# Altium PCB AVP32F08_EVM_Rev1.1.PcbDoc (part 1 of 2)
Units mm, origin at the board's own origin, x right, y up, seen from the top; angles counter-clockwise.
Board outline 120.23 x 75.25 mm, 4 copper layers (Top Layer, GND, S1, Bottom Layer), stack 2.642 mm thick; 139 components, 118 nets, 534 pads, 235 vias.
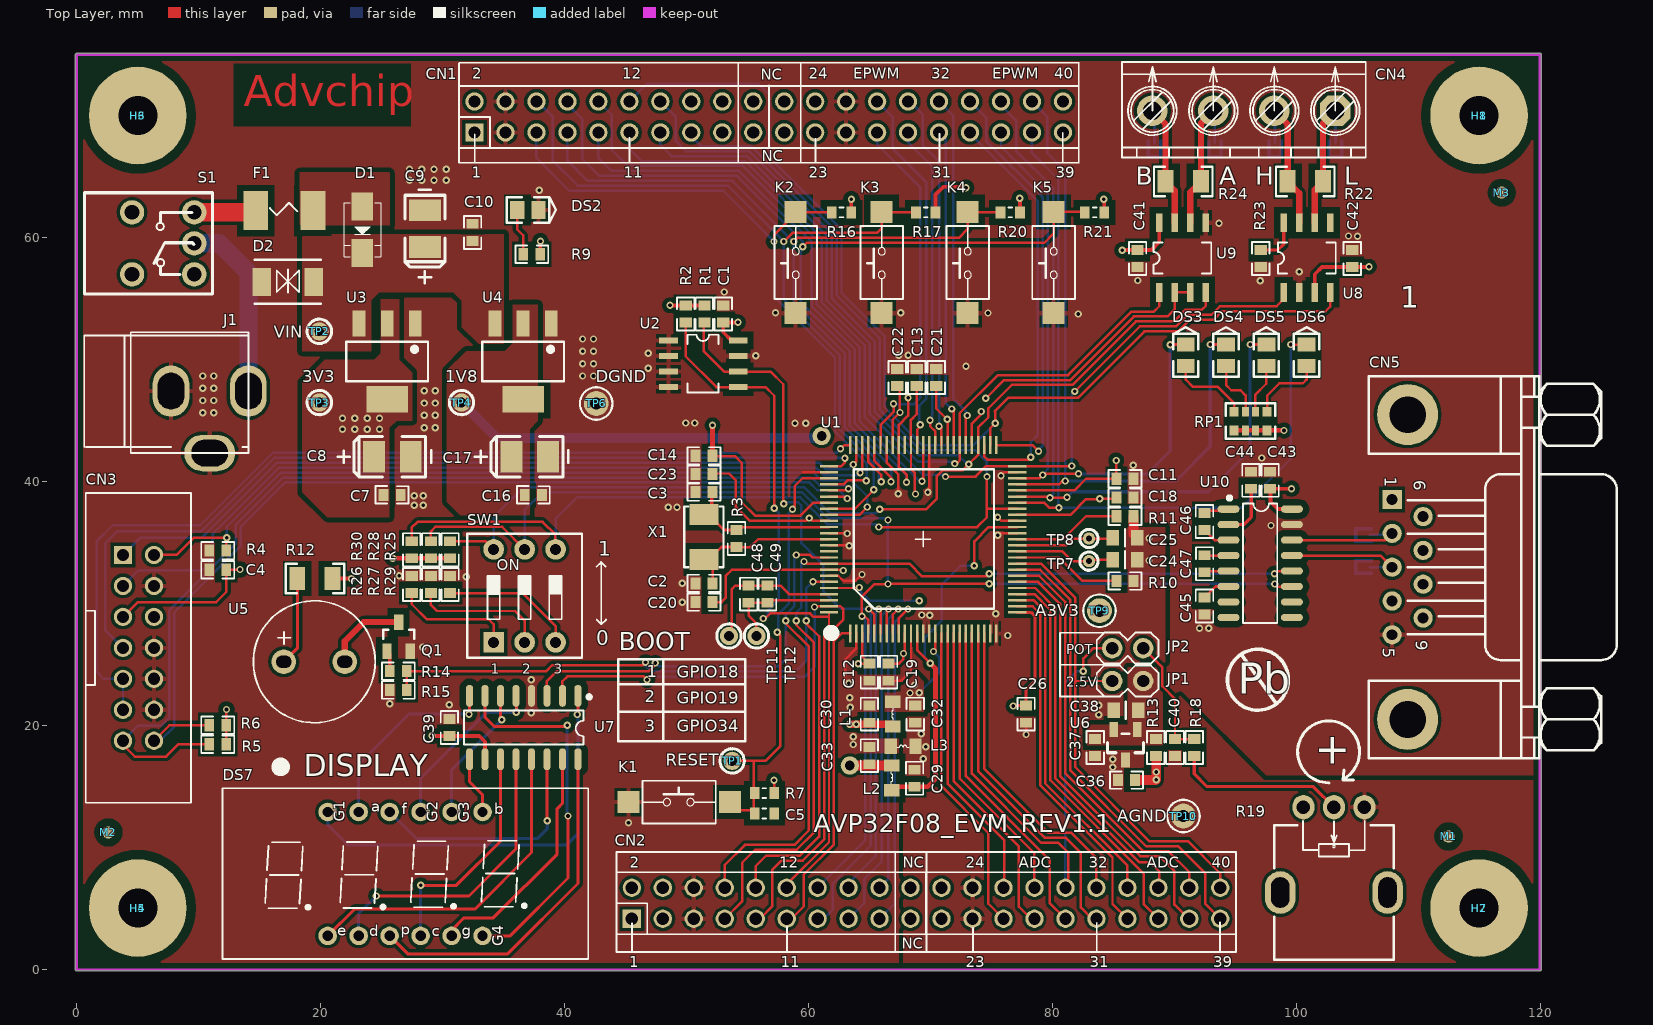
[diagram p0: Top Layer view]
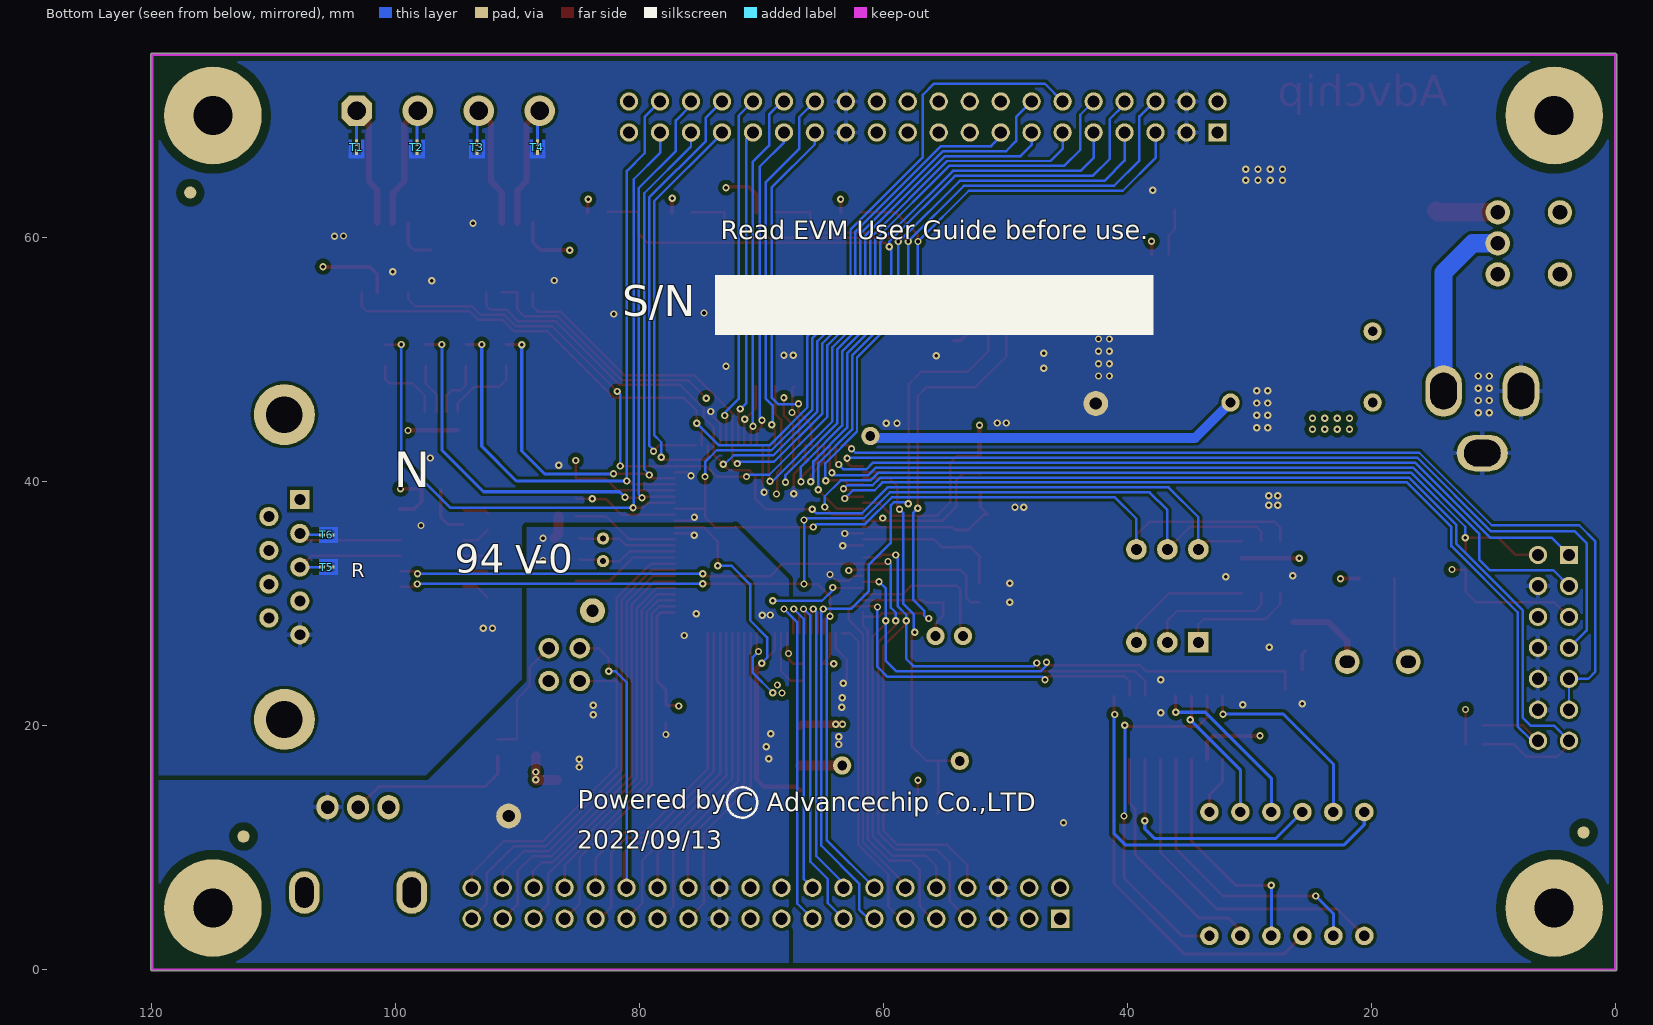
[diagram p1: Bottom Layer view, seen from below]
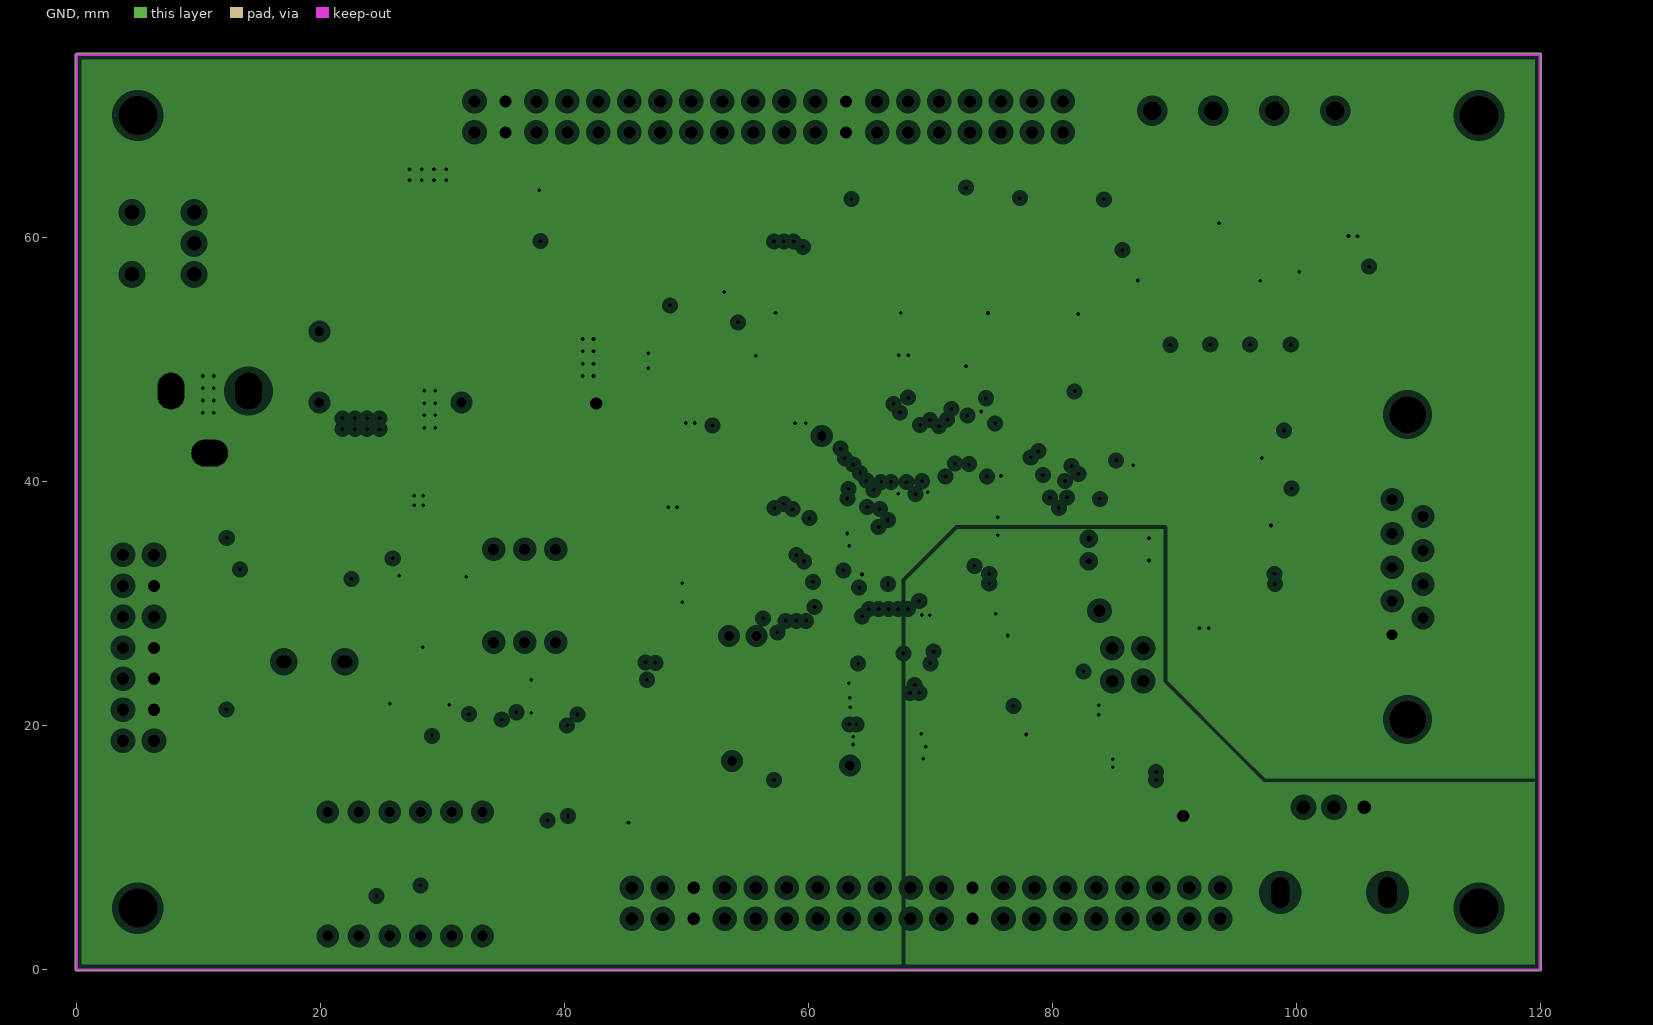
[diagram p2: GND, clearances drawn from the general rule]
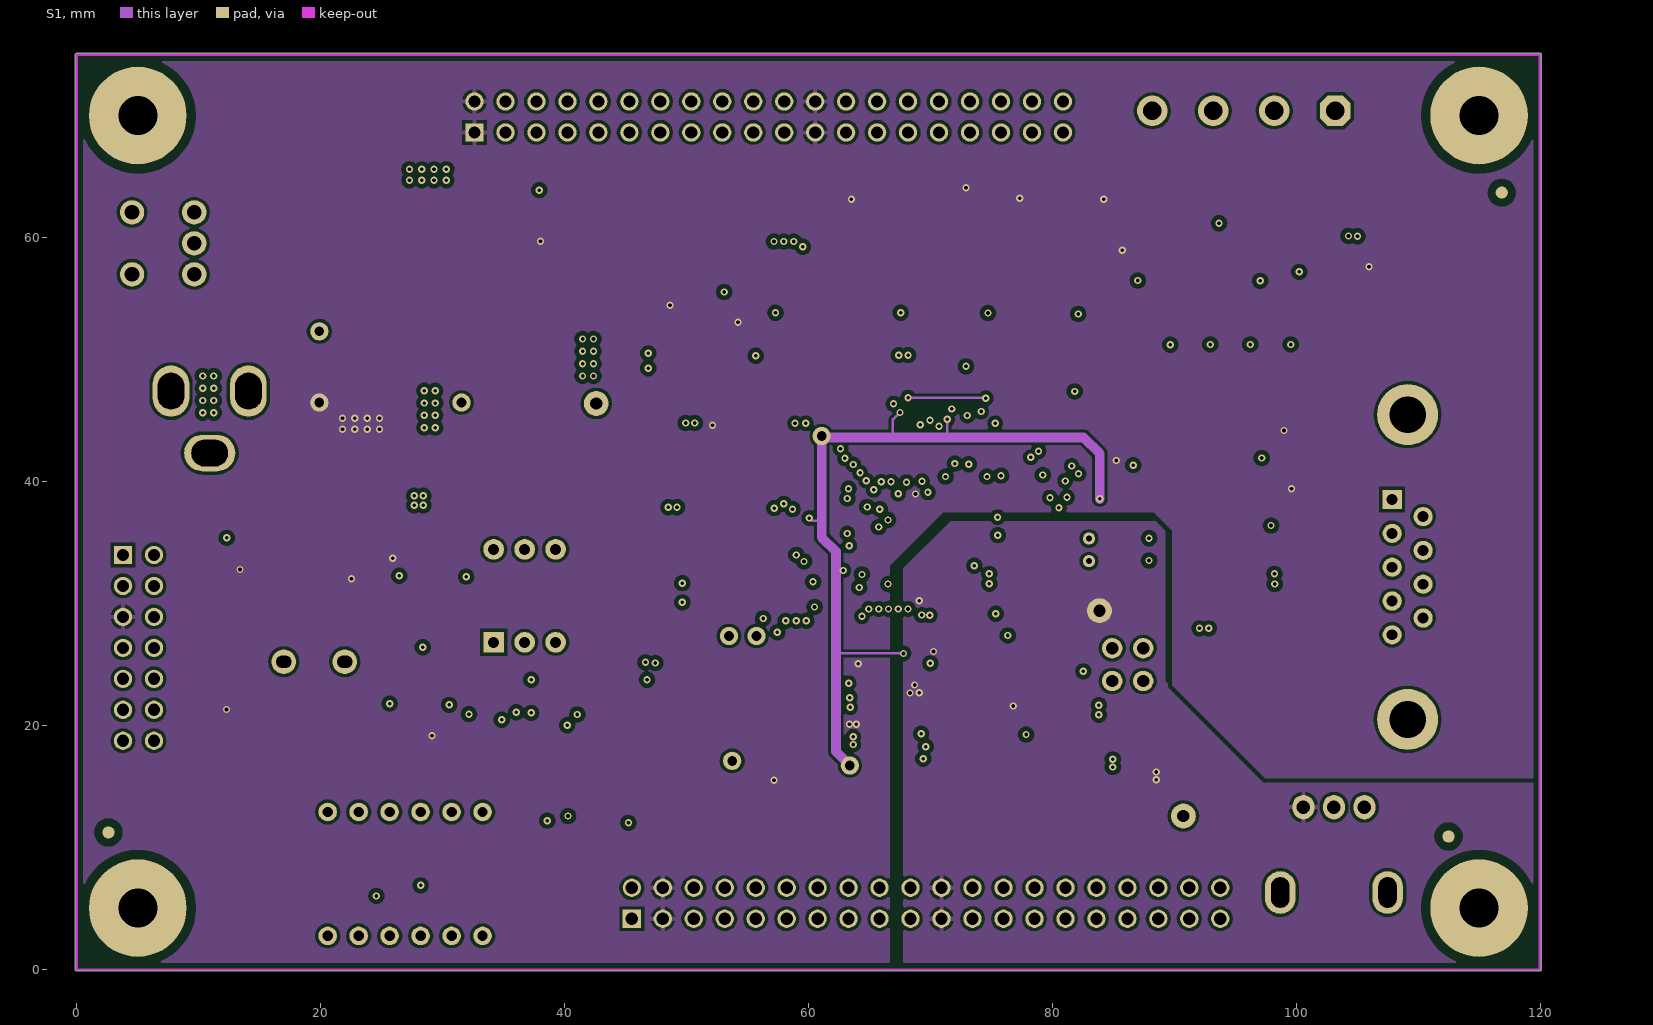
[diagram p3: S1]

## Layer stack, top to bottom
Top Solder: solder mask 0.0102, Solder Resist, Dk 3.5
Top Layer: signal copper 0.0711
Dielectric 3: dielectric 0.254, Dk 4.2
GND: plane copper 0.036, net (Multiple Nets)
Dielectric4: dielectric 0.32, FR-4, Dk 4.8
S1: signal copper 0.036
Dielectric 4: dielectric 0.254, Dk 4.2
Dielectric 2: core 1.6, FR-4, Dk 4.2
Bottom Layer: signal copper 0.0711
Bottom Solder: solder mask 0.0102, Solder Resist, Dk 3.5

## Board outline
-0.126,0.025 -0.126,74.981 cw(c-0.025,74.981) -0.096,75.052 -0.077,75.071 cw(c-0.006,75) -0.006,75.1 120,75.1 cw(c120,75) 120.1,75 cw(c120,75) 120.09,74.956 120.09,-0.051 cw(c119.99,-0.051) 119.99,-0.151 -0.025,-0.151 cw(c-0.025,-0.051) -0.118,-0.013 cw(c-0.025,0.025)

## Design rules (kind name [scope] priority, off if disabled: settings)
AcuteAngle [All] p1 off: minimum=4.50000000000000E+0001 checktracksonly=FALSE
AssemblyTestPointUsage [All] p1: valid=2
BoardOutlineClearance BoardOutlineClearance_MountingHoles [OnCopper and InComponentClass('Mounting Holes')] p1: gap=1.016 ignorepadtopadclearanceinfootprint=FALSE
BoardOutlineClearance BoardOutlineClearance_Poly [OnCopper and IsPoly] p2: gap=0.635 ignorepadtopadclearanceinfootprint=FALSE
Clearance Clearance_PAD_NC [InNet('PAD_NC')] p1: gap=0.381 ignorepadtopadclearanceinfootprint=TRUE
Clearance Clearance_dingwei [HasFootprint('NY PMS 440 0025 PH')] p2: gap=0.762 ignorepadtopadclearanceinfootprint=TRUE
Clearance Clearance_MCU [All vs InComponent('U1')] p3: gap=0.152 ignorepadtopadclearanceinfootprint=TRUE except(0.381: SMDPad-Fill SMDPad-Poly SMDPad-Region) // MCU安全间距
Clearance Clearance_Keepouts [((IsTrack Or IsArc) And Not InPoly) And IsFree and IsKeepOut vs ((IsTrack Or IsArc) And Not InPoly) And IsFree and IsKeepOut] p4: gap=0 ignorepadtopadclearanceinfootprint=FALSE
Clearance Clearance_Poly [InPolygon] p5: gap=0.254 ignorepadtopadclearanceinfootprint=TRUE except(0.381: Fill-Fill Fill-Poly Fill-Region Poly-Poly Poly-Region Region-Region; 0.508: SMDPad-SMDPad SMDPad-THPad SMDPad-Fill SMDPad-Poly SMDPad-Region SMDPad-Text SMDPad-Hole THPad-THPad THPad-Via THPad-Text THPad-Hole Via-Text Via-Hole Fill-Text Fill-Hole Poly-Text Poly-Hole Region-Text Region-Hole Text-Text Text-Hole)
Clearance [All] p6: gap=0.203 ignorepadtopadclearanceinfootprint=TRUE except(0.127: Arc-Via Track-Via)
ComponentClearance [All] p1 off: gap=0.762 collisioncheckmode=3 verticalgap=0.254 showdistances=FALSE
DiffPairsRouting [All] p1: maxlimit=2.54 minlimit=0.254 mostfreqgap=0.254 toplayer_minwidth=0.381 toplayer_maxwidth=0.381 toplayer_prefwidth=0.381 midlayer1_minwidth=0.381 midlayer1_maxwidth=0.381 midlayer1_prefwidth=0.381 bottomlayer_minwidth=0.381 bottomlayer_maxwidth=0.381 bottomlayer_prefwidth=0.381 maxuncoupledlength=25.4
FabricationTestPointUsage TestPointUsage [All] p1: valid=2 allowmultiple=FALSE
FabricationTestpoint Testpoint [All] p1: side=3 testpointundercomponent=TRUE minsize=1.016 maxsize=2.54 preferedsize=1.524 minholesize=0 maxholesize=1.016 preferedholesize=0.813 testpointgrid=0.025 allowsidetop=TRUE allowsidebottom=TRUE usegrid=TRUE gridtolerance=0
FanoutControl Fanout_LCC [IsLCC] p1: bgadir=Out bgaviamode=Centered fanoutstyle=Auto fanoutdirection=Alternating viagrid=0.025 // Fanout_LCC (Default Rule)
FanoutControl Fanout_SOIC [IsSOIC] p2: bgadir=Out bgaviamode=Centered fanoutstyle=Auto fanoutdirection=Alternating viagrid=0.025 // Fanout_SOIC (Default Rule)
FanoutControl Fanout_Default [All] p3: bgadir=Out bgaviamode=Centered fanoutstyle=Auto fanoutdirection=Alternating viagrid=0.025 // Fanout_Default (Default Rule)
HoleSize [All] p1: absolutevalues=TRUE maxlimit=6.375 minlimit=0.203 maxpercent=80.000 minpercent=20.000
Length SRAM_DATA [InNetClass('SRAM_DATA')] p1 off: maxlimit=43.688 minlimit=41.148
Length SRAM_ADDR [InNetClass('SRAM_ADDR')] p2 off: maxlimit=46.177 minlimit=43.637 // 高速线长度
MinimumAnnularRing MinimumAnnularRing_ThermalPadVias [IsVia and InAnyComponent] p1: minimumring=0.15
MinimumAnnularRing [All] p2: minimumring=0.127
MinimumSolderMaskSliver [All] p1: minsoldermaskwidth=0
PlaneClearance [All] p1: clearance=0.508
PlaneConnect [All] p1: planeconnectstyle=Direct reliefexpansion=0.254 reliefentries=4 reliefconductorwidth=0.254 reliefairgap=0.254
PolygonConnect PolygonConnect_Connectors [All vs (HasFootprint('IDC2X10') OR HasFootprint('IDC2X16') OR HasFootprint('IDC2X22') OR HasFootprint('IDC14-L') OR HasFootprint('DC-005') OR HasFootprint('J-DG128-2') OR HasFootprint('PJ325')OR HasFootprint('RK09K1130') OR HasFootprint('SIP11_TFT') OR HasFootprint('USB-C-SMD-16P') OR HasFootprint('SIP4X2A'))] p1: thpad.connectstyle=Relief thpad.reliefconductorwidth=0.381 thpad.reliefentries=4 thpad.polygonreliefangle="90 Angle" thpad.airgapwidth=0.254 smdpad.connectstyle=Direct smdpad.reliefconductorwidth=0.254 smdpad.reliefentries=4 smdpad.polygonreliefangle="90 Angle" smdpad.airgapwidth=0.254 via.connectstyle=Direct via.reliefconductorwidth=0.254 via.reliefentries=4 via.polygonreliefangle="90 Angle" via.airgapwidth=0.254
PolygonConnect PolygonConnect_SMD2 [All vs (HasFootprint('C0603') OR HasFootprint('R0603') OR HasFootprint('SOT-23-6') OR HasFootprint('C1206') OR HasFootprint('C0805') OR HasFootprint('R0805') OR HasFootprint('SH1.0-8P') OR HasFootprint('SOT-23') OR HasFootprint('SIP3') OR HasFootprint('0603_LED_RED_NP'))] p2: thpad.connectstyle=Relief thpad.reliefconductorwidth=0.381 thpad.reliefentries=4 thpad.polygonreliefangle="90 Angle" thpad.airgapwidth=0.254 smdpad.connectstyle=Direct smdpad.reliefconductorwidth=0.381 smdpad.reliefentries=4 smdpad.polygonreliefangle="90 Angle" smdpad.airgapwidth=0.254 via.connectstyle=Direct via.reliefconductorwidth=0.254 via.reliefentries=4 via.polygonreliefangle="90 Angle" via.airgapwidth=0.254
PolygonConnect PolygonConnect_SMD1 [All vs ( HasFootprint('DB9') OR HasFootprint('SO-8') OR HasFootprint('SW-3X6') OR HasFootprint('LQFP-100') OR HasFootprint('SMD_LED0805_LED') OR HasFootprint('CASE-A-3216') OR HasFootprint('IDC2X20') OR HasFootprint('J-DG128-5') OR HasFootprint('Harwin_D3082-05'))] p3: thpad.connectstyle=Relief thpad.reliefconductorwidth=0.381 thpad.reliefentries=4 thpad.polygonreliefangle="90 Angle" thpad.airgapwidth=0.254 smdpad.connectstyle=Relief smdpad.reliefconductorwidth=0.381 smdpad.reliefentries=4 smdpad.polygonreliefangle="90 Angle" smdpad.airgapwidth=0.254 via.connectstyle=Direct via.reliefconductorwidth=0.254 via.reliefentries=4 via.polygonreliefangle="90 Angle" via.airgapwidth=0.254
PolygonConnect [All] p4: connectstyle=Direct reliefconductorwidth=0.254 reliefentries=4 polygonreliefangle="90 Angle" airgapwidth=0.254
RoutingVias ThermalPadVias [IsVia and InAnyComponent] p1: holewidth=0.305 width=0.635 viastyle="Through Hole" minholewidth=0.254 minwidth=0.508 maxholewidth=0.762 maxwidth=1.27
RoutingVias [All] p2: holewidth=0.305 width=0.635 viastyle="Through Hole" minholewidth=0.254 minwidth=0.508 maxholewidth=0.762 maxwidth=1.27
SilkToBoardRegionClearance [Not ((IsComment or IsDesignator) And (Hide <> 'False')) and not InRegion(1000,500,4000,800)] p1:
SilkToSilkClearance SilkToSilkClearance_Pb-FreeLogo [(HasFootprint('Pb-Free_Overlay_Medium') OR HasFootprint('Pb-Free_Overlay_Small')) vs (HasFootprint('Pb-Free_Overlay_Medium') OR HasFootprint('Pb-Free_Overlay_Small'))] p1 off: silktosilkclearance=0
SilkToSilkClearance [All] p2 off: silktosilkclearance=0.102
SilkToSolderMaskClearance SilkToComponentPadClearance [(IsPad or IsFill or IsRegion) and InAnycomponent] p1 off: minsilkscreentomaskgap=0.099 clearancetoexposedcopper=TRUE
SilkToSolderMaskClearance "Silk to Solder Mask Opening" [All] p2 off: minsilkscreentomaskgap=0.102 clearancetoexposedcopper=FALSE
SolderMaskExpansion [All] p1: expansion=0.05
Width [All] p1: maxlimit=2.54 minlimit=0.152 preferedwidth=0.254 checkconnectedcopper=TRUE
14 further rules are at their usual default settings.

## Classes and differential pairs
component class "4.Communication Interface": C41 C42 C43 C44 C45 C46 C47 CN4 CN5 CN7 H1 H2 H3 H4 H5 H6 H7 H8 M1 M2 M3 R22 R23 R24 T1 T2 T3 T4 T5 T6 U8 U9 U10
component class "3.uC Peripheral": C36 C37 C38 C39 C40 C511 C514 C515 DS3 DS4 DS5 DS6 DS7 JP1 JP2 K2 K3 K4 K5 Q1 R12 R13 R14 R15 R16 R17 R18 R19 R20 R21 RP1 U5 U6 U7
component class 2.Power: C7 C8 C9 C10 C11 C12 C13 C14 C16 C17 C18 C19 C20 C21 C22 C23 C24 C25 C26 C29 C30 C32 C33 C48 C49 D1 D2 DS2 F1 J1 L1 L2 L3 R9 R10 R11 S1 TP2 TP3 TP4 TP6 TP7 TP8 TP9 TP10 TP11 TP12 TP30 U3 U4

## Components (designator, comment, footprint, x,y, rotation, side; value= is the part's Value field where it differs from the comment)
C1 "0.1uF/50V" 0603CX 53.01,53.721 r90 top value=0.1uF
C2 "22pF/50V" 0603cx 51.435,31.623 r180 top value=100pF
C3 "22pF/50V" 0603CX 51.435,39.116 r0 top value=100pF
C4 "0.1uF/50V" 0603CX 11.557,32.741 r180 top value=0.1uF
C5 "0.1uF/50V" C0603 56.388,12.751 r0 top value=0.1uF
C7 "0.1uF/50V" 0603CX 25.857,38.887 r0 top value=0.1uF
C8 "100uF/10V" CASE-B-3528 25.883,42.012 r180 top
C9 "100uF/10V" CASE-B-3528 28.55,60.731 r270 top
C10 "0.1uF/50V" 0603CX 32.461,60.412 r90 top value=0.1uF
C11 "0.1uF/50V" 0603CX 85.965,40.208 r0 top value=0.1uF
C12 "0.1uF/50V" 0603CX 64.999,24.347 r270 top value=0.1uF
C13 "0.1uF/50V" 0603CX 68.885,48.514 r90 top value=0.1uF
C14 "0.1uF/50V" 0603CX 51.435,42.088 r180 top value=0.1uF
C16 "0.1uF/50V" 0603CX 37.44,38.887 r0 top value=0.1uF
C17 "100uF/10V" CASE-B-3528 37.135,42.012 r180 top
C18 "0.1uF/50V" 0603CX 85.965,38.669 r0 top value=0.1uF
C19 "0.1uF/50V" 0603CX 66.573,24.347 r270 top value=0.1uF
C20 "0.1uF/50V" 0603CX 51.435,30.099 r180 top value=0.1uF
C21 "0.1uF/50V" 0603CX 70.485,48.514 r90 top value=0.1uF
C22 "0.1uF/50V" 0603CX 67.285,48.514 r90 top value=0.1uF
C23 "0.1uF/50V" 0603CX 51.435,40.594 r180 top value=0.1uF
C24 "10uF/10V" C0805 85.965,33.553 r0 top value=10uF
C25 "10uF/10V" C0805 85.965,35.357 r0 top value=10uF
C26 "1uF/25V" 0603CX 77.851,20.904 r270 top value=1uF
C29 "0.1uF/50V" 0603CX 68.707,15.646 r90 top value=0.1uF
C30 "0.1uF/50V" 0603CX 65.004,20.904 r90 top value=2.2uF
C32 "0.1uF/50V" 0603CX 68.758,20.904 r270 top value=0.1uF
C33 "0.1uF/50V" 0603CX 65.004,17.501 r90 top value=2.2uF
C36 "1uF/25V" 0603CX 86.081,15.494 r180 top value=1uF
C37 "0.1uF/50V" 0603CX 83.515,18.161 r270 top value=0.1uF
C38 "10uF/10V" C0805 86.041,21.234 r180 top value=10uF
C39 "0.1uF/50V" 0603CX 30.556,19.812 r90 top value=0.1uF
C40 "0.1uF/50V" 0603CX 90.063,18.161 r270 top value=0.1uF
C41 "0.1uF/50V" 0603CX 86.995,58.268 r270 top value=0.1uF
C42 "0.1uF/50V" 0603CX 104.597,58.268 r90 top value=0.1uF
C43 "0.1uF/50V" 0603CX 97.866,40.081 r90 top value=0.1uF
C44 "0.1uF/50V" 0603CX 96.292,40.081 r90 top value=0.1uF
C45 "0.1uF/50V" 0603CX 92.481,29.769 r270 top value=0.1uF
C46 "0.1uF/50V" 0603CX 92.481,36.703 r270 top value=0.1uF
C47 "0.1uF/50V" 0603CX 92.486,33.236 r270 top value=0.1uF
C48 "0.1uF/50V" 0603CX 55.093,30.745 r270 top value=0.1uF
C49 "1uF/25V" 0603CX 56.642,30.745 r270 top value=1uF
CN1 "2.54-2X20P 排针" IDC2X20 32.614,68.612 r0 top
CN2 "2.54-2X20P 排针" IDC2X20 45.517,4.122 r0 top
CN3 "2.54-2X7P 简易牛角母座" IDC14-L 5.075,28.876 r270 top value=2.54-2X7P
CN4 "KF301-4P-5.08" J-DG128-4 95.707,70.383 r180 top
CN5 "DB9" db9 109.144,32.967 r0 top
D1 "SS14" SMA 23.419,60.63 r90 top
D2 "SMBJ6.8CA" SMB2 17.291,56.363 r0 top
DS2 "黄色LED" SMD_LED0805_LED 36.996,62.255 r180 top
DS3 "红色 LED" SMD_LED0805_LED 90.947,50.336 r270 top
DS4 "红色 LED" SMD_LED0805_LED 94.249,50.336 r270 top
DS5 "红色 LED" SMD_LED0805_LED 97.551,50.336 r270 top
DS6 "红色 LED" SMD_LED0805_LED 100.853,50.336 r270 top
DS7 "FJ3461AH" 0.36X4 26.924,7.798 r0 top value=0.36×4
F1 "1.5A/24V" 1812_PTC_NP 17.018,62.205 r0 top
H1 "M3*12+6" "NY PMS 440 0025 PH"#1 115,70 r0 top
H2 "PN-3" Keystone_1902C 115,5 r0 top
H3 "M3*12+6" "NY PMS 440 0025 PH"#1 5,70 r0 top
H4 "PN-3" Keystone_1902C 5,5 r0 top
H5 "M3*12+6" "NY PMS 440 0025 PH"#2 5.105,4.902 r0 top
H6 "PN-3" Keystone_1902C 5,70 r0 top
H7 "M3*12+6" "NY PMS 440 0025 PH"#1 115,5 r0 top
H8 "PN-3" Keystone_1902C 115,70 r0 top
J1 "DC-005-20A" DC-005 14.072,47.396 r0 top
JP1 "XH2.54-2P" SIP2C 86.182,23.622 r180 top
JP2 "XH2.54-2P" SIP2C 86.182,26.314 r180 top
K1 "1TS002B-2400-5001-CT" SW-3X6 49.403,13.691 r270 top value=1TS002B
K2 "1TS002B-2400-5001-CT" SW-3X6 58.953,57.937 r0 top value=1TS002B
K3 "1TS002B-2400-5001-CT" SW-3X6 66.006,57.937 r0 top value=1TS002B
K4 "1TS002B-2400-5001-CT" SW-3X6 73.059,57.937 r0 top value=1TS002B
K5 "1TS002B-2400-5001-CT" SW-3X6 80.112,57.937 r0 top value=1TS002B
L1 "BLM21PG221SN" L-0805 66.904,20.904 r90 top value=220Ω@100MHZ
L2 "BLM21PG221SN" L-0805 66.853,15.672 r270 top value=220Ω@100MHZ
L3 "BLM21PG221SN" L-0805 67.767,18.263 r0 top value=220Ω@100MHZ
M1 "" Mark1 112.497,10.871 r0 top
M2 "" Mark1 2.591,11.201 r0 top
M3 "" Mark1 116.865,63.678 r0 top
Q1 "2N7002K" MOS-SOT23 26.391,27.254 r0 top
R1 "10KΩ" 0603RX 51.473,53.721 r90 top value=1K
R2 "10KΩ" 0603RX 49.936,53.721 r90 top value=1K
R3 "1MΩ" 0603RX 54.102,35.306 r90 top value=1K
R4 "2.2KΩ" 0603RX 11.557,34.315 r0 top value=1K
R5 "10KΩ" 0603RX 11.557,18.44 r180 top value=1K
R6 "10KΩ" 0603RX 11.557,19.99 r180 top value=1K
R7 "10KΩ" R0603 56.388,14.427 r180 top value=1K
R9 "1KΩ" 0603RX 37.313,58.623 r180 top value=1K
R10 "0R" 0603RX 85.965,31.826 r180 top value=1K
R11 "20KΩ" 0603RX 85.965,37.135 r180 top value=1K
R12 "22R" 1206RX 19.53,32.029 r180 top value=1K
R13 "470R" 0603RX 88.494,18.161 r90 top
R14 "1KΩ" 0603RX 26.365,24.435 r0 top value=1K
R15 "4.7KΩ" 0603RX 26.365,22.885 r180 top value=1K
R16 "10KΩ" R0603 62.713,62.052 r180 top value=1K
R17 "10KΩ" R0603 69.63,62.052 r180 top value=1K
R18 "1KΩ" 0603RX 91.643,18.161 r90 top value=1K
R19 "RK09K1130A6S  10KΩ" RK09K1130 103.099,6.274 r180 top
R20 "10KΩ" R0603 76.547,62.052 r180 top value=1K
R21 "10KΩ" R0603 83.464,62.052 r180 top value=1K
R22 "120R" 1206RX 100.754,64.592 r180 top
R23 "10KΩ" 0603RX 97.104,58.268 r90 top value=1K
R24 "120R" 1206RX 90.746,64.592 r180 top value=1K
R25 "10KΩ" 0603RX 30.612,34.385 r90 top value=1K
R26 "1KΩ" 0603RX 27.464,31.534 r90 top value=1K
R27 "1KΩ" 0603RX 29.039,31.534 r90 top value=1K
R28 "10KΩ" 0603RX 29.037,34.385 r90 top value=1K
R29 "1KΩ" 0603RX 30.614,31.534 r90 top value=1K
R30 "10KΩ" 0603RX 27.462,34.385 r90 top value=1K
RP1 "1KΩ" 0603Rx_4P 96.262,44.943 r0 top value=1K
S1 "SMTS-102C3" SW2 9.627,59.512 r0 top
SW1 "DS-03RP" DS-03RP 36.728,30.607 r90 top
T1 "SPARK_GAP" SPARK_GAP 103.226,67.259 r180 bottom
T2 "SPARK_GAP" SPARK_GAP 98.281,67.259 r180 bottom
T3 "SPARK_GAP" SPARK_GAP 93.337,67.259 r180 bottom
T4 "SPARK_GAP" SPARK_GAP 88.392,67.259 r180 bottom
T5 "SPARK_GAP" SPARK_GAP 105.537,32.969 r90 bottom
T6 "SPARK_GAP" SPARK_GAP 105.537,35.611 r90 bottom
TP1 "RST" TEST-0.8/1.5MM 53.746,17.069 r0 top
TP2 "VIN+" TEST-0.8/1.5MM 19.888,52.299 r0 top
TP3 "+3V3" TEST-0.8/1.5MM 19.888,46.457 r0 top
TP4 "+1V8" TEST-0.8/1.5MM 31.547,46.457 r0 top
TP6 "DGND" Keystone5002 42.596,46.38 r0 top
TP7 "VREFM" TEST-0.5/1MM 83.007,33.452 r90 top
TP8 "VREFP" TEST-0.5/1MM 83.007,35.306 r90 top
TP9 "AVCC" Keystone5002 83.871,29.388 r90 top
TP10 "AGND" Keystone5002 90.754,12.548 r0 top
TP11 "+1.5V" TEST-0.8/1.5MM 53.483,27.314 r270 top
TP12 "G" TEST-0.8/1.5MM 55.737,27.314 r270 top
U1 "AVP32F08QP100A" LQFP-100 69.418,35.331 r90 top
U2 "AT24C02C-SSHM-T" SO-8 51.384,49.632 r270 top
U3 "AMS1117-3.3V" SOT-223 25.451,49.835 r180 top
U4 "AMS1117-1.8V" SOT-223 36.601,49.835 r180 top
U5 "Cy-9650-3029" SUN-0905-3V 19.471,25.197 r0 top
U6 "TL431" SOT-23 86.004,18.39 r90 top
U7 "AIP650" SOIC-16_150mil 36.652,19.803 r180 top
U8 "SN65HVD230D" SO-8 100.889,58.344 r0 top
U9 "SP3485EN-L/TR" SO-8 90.678,58.344 r0 top
U10 "SP3232EEN" SOIC-16_150mil 97.053,33.274 r270 top
X1 "X503230MSB2GI" XTAL_5032 51.435,35.433 r270 top value=30MHZ

## Footprints (in the part's own frame and the unit in brackets; to place one, negate y for a bottom-side part, rotate by r counter-clockwise, add the part's x,y. Pads: shape width x height; smd on the part's side, far side on the other; paste and mask are expansions set on the pad)
0.36X4 [mil] "4位0.36寸数码管"
  round 60 hole 33.46: a(-150,200) b(250,200) c(50,-200) com1(-250,200) com2(50,200) com3(150,200) com4(250,-200) d(-150,-200) dp(-50,-200) e(-250,-200) f(-50,200) g(150,-200)
  silkscreen extent -590,-275 592,276, body extent -591,-276 591,276, height 283
0603CX [mm] "标准型  脚距1.4mm"
  rect 0.8x1 smd mask+0.102: 1(-0.7,0) 2(0.7,0)
  silkscreen extent -1.35,-0.71 1.35,0.72, body extent -0.76,-0.38 0.76,0.38, height 0.68
0603cx [mm] "标准型  脚距1.4mm"
  rect 0.8x1 smd mask+0.102: 1(-0.7,0) 2(0.7,0)
  silkscreen extent -1.35,-0.71 1.35,0.72, body extent -0.76,-0.38 0.76,0.38, height 0.68
0603RX [mm] "标准型 间距1.4mm  焊盘尺寸0.8/1mm"
  rect 0.8x1 smd mask+0.102: 1(-0.7,0) 2(0.7,0)
  silkscreen extent -1.35,-0.71 1.35,0.72, body extent -0.8,-0.4 0.8,0.4, height 0.43
0603Rx_4P [mm]
  rect 0.75x0.8 smd mask+0.051: 1(-1.35,-0.77) 4(1.35,-0.77) 5(1.35,0.77) 8(-1.35,0.77)
  rect 0.58x0.8 smd mask+0.051: 2(-0.4,-0.77) 3(0.4,-0.77) 6(0.4,0.77) 7(-0.4,0.77)
  silkscreen extent -2.03,-1.47 2.02,1.47, body extent -1.55,-0.8 1.65,0.8, height 0.5
1206RX [mm]
  rect 1.3x1.85 smd: 1(-1.45,0) 2(1.45,0)
  silkscreen extent -2.4,-1.21 2.4,1.21, body extent -1.57,-0.8 1.63,0.8, height 0.6
1812_PTC_NP [mil]
  rect 80x125 smd: 1(-92.5,0) 2(92.5,0)
  silkscreen extent -47,-15 42,25, body extent -84,-63 94,63, height 20
C0603 [mm]
  rect 0.8x1 smd mask+0.051: 1(-0.8,0) 2(0.8,0)
  silkscreen extent -0.15,-0.4 0.15,0.4, body extent -0.71,-0.38 0.81,0.38, height 0.68
C0805 [mil] "标准型 间距40mil"
  rect 40x50 smd: 1(-40,0) 2(40,0)
  silkscreen extent 0,-28 0,28, body extent -59,-28 59,27, height 37
CASE-B-3528 [mm]
  rect 1.8x2.6 smd: 1(1.5,0) 2(-1.5,0)
  silkscreen extent -3.17,-1.65 4.5,1.65, body extent -1.85,-1.47 1.85,1.46, height 2.03
db9 [mil]
  round 196.67 hole 118.33: 0(0,-492.08) 0(0,492.08)
  rect 62x62 hole 35: 1(-50,217.92)
  round 62 hole 35: 2(-50,108.75) 3(-50,-0.42) 4(-50,-109.58) 5(-50,-218.75) 6(50,162.92) 7(50,53.75) 8(50,-55.42) 9(50,-164.58)
  silkscreen extent -125,-617 675,616, body extent -108,-601 550,600, height 124
DC-005 [mm] "接口大小9X11MM    5.5-2.1mm"
  oval 3x4.2 hole 2.2 slot 3 at 90 deg: 1(0,0) 3(-6.35,0)
  oval 4.2x3 hole 2.2 slot 3 at 0 deg: 2(-3.175,-5.08)
  silkscreen extent -13.46,-5.08 0,4.83, body extent -13.7,-5.02 0.45,4.56, height 11
DS-03RP [mm]
  rect 1.7x1.7 hole 0.9: 1(-3.81,2.54)
  round 1.7 hole 0.9: 2(-3.81,0) 3(-3.81,-2.54) 4(3.81,-2.54) 5(3.81,0) 6(3.81,2.54)
  silkscreen extent -5.08,-4.7 5.08,4.7, body extent -4.95,-4.59 4.95,4.59, height 6.65
IDC2X20 [mm] "2.54X40P双排插针"
  rect 1.5x1.5 hole 1: 1(0,0)
  round 1.5 hole 1: 2(0,2.54) 3(2.54,0) 4(2.54,2.54) 5(5.08,0) 6(5.08,2.54) 7(7.62,0) 8(7.62,2.54) 9(10.16,0) 10(10.16,2.54) 11(12.7,0) 12(12.7,2.54) 13(15.24,0) 14(15.24,2.54) 15(17.78,0) 16(17.78,2.54) 17(20.32,0) 18(20.32,2.54) 19(22.86,0) 20(22.86,2.54) 21(25.4,0) 22(25.4,2.54) 23(27.94,0) 24(27.94,2.54) 25(30.48,0) 26(30.48,2.54) 27(33.02,0) 28(33.02,2.54) 29(35.56,0) 30(35.56,2.54) 31(38.1,0) 32(38.1,2.54) 33(40.64,0) 34(40.64,2.54) 35(43.18,0) 36(43.18,2.54) 37(45.72,0) 38(45.72,2.54) 39(48.26,0) 40(48.26,2.54)
  silkscreen extent -1.27,-1.27 49.56,3.84, body extent -1.23,-1.23 49.61,3.85, height 8.4
IDC14-L [mm]
  rect 1.5x1.5 hole 1: 1(-5.084,-1.29)
  round 1.5 hole 1: 2(-5.084,1.25) 3(-2.544,-1.29) 4(-2.544,1.25) 5(-0.004,-1.29) 6(-0.004,1.25) 7(2.536,-1.29) 8(2.536,1.25) 9(5.076,-1.29) 10(5.076,1.25) 11(7.616,-1.29) 12(7.616,1.25) 13(10.156,-1.29) 14(10.156,1.25)
  silkscreen extent -10.16,-4.34 15.24,4.3, body extent -10.18,-4.47 15.26,4.65, height 9.1
J-DG128-4 [mm]
  oct 2.5x2.5 hole 1.5: 1(-7.5,0)
  round 2.5 hole 1.5: 2(-2.5,0) 3(2.5,0) 4(7.5,0)
  silkscreen extent -10,-4 10,3.84, body extent -10,-3.59 10,3.91, height 10
Keystone5002 [mil] "测试点"
  round 80 hole 40: 1(0,0)
  silkscreen extent -52,-52 52,52, body extent -49,-49 49,49, height 182
Keystone_1902C [mil] "Hex Standoff, 4-40 threaded, nylon"
  round 1 on Mech4: 0(0,0)
  body extent -145,-126 146,126, height 501
L-0805 [mil] "标准型  间距40mil 电感"
  rect 40x50 smd: 1(-40,0) 2(40,0)
  silkscreen extent -20,-3 19,3, body extent -39,-26 39,24, height 36
LQFP-100 [mm]
  rect 1.5x0.2 smd: 1(-7.807,6.006) 2(-7.807,5.506) 3(-7.807,5.006) 4(-7.807,4.506) 5(-7.807,4.006) 6(-7.807,3.506) 7(-7.807,3.006) 8(-7.807,2.506) 9(-7.807,2.006) 10(-7.807,1.506) 11(-7.807,1.006) 12(-7.807,0.506) 13(-7.807,0.006) 14(-7.807,-0.494) 15(-7.807,-0.994) 16(-7.807,-1.494) 17(-7.807,-1.994) 18(-7.807,-2.494) 19(-7.807,-2.994) 20(-7.807,-3.494) 21(-7.807,-3.994) 22(-7.807,-4.494) 23(-7.807,-4.994) 24(-7.807,-5.494) 25(-7.807,-5.994) 51(7.643,-5.994) 52(7.643,-5.494) 53(7.643,-4.994) 54(7.643,-4.494) 55(7.643,-3.994) 56(7.643,-3.494) 57(7.643,-2.994) 58(7.643,-2.494) 59(7.643,-1.994) 60(7.643,-1.494) 61(7.643,-0.994) 62(7.643,-0.494) 63(7.643,0.006) 64(7.643,0.506) 65(7.643,1.006) 66(7.643,1.506) 67(7.643,2.006) 68(7.643,2.506) 69(7.643,3.006) 70(7.643,3.506) 71(7.643,4.006) 72(7.643,4.506) 73(7.643,5.006) 74(7.643,5.506) 75(7.643,6.006)
  rect 0.2x1.5 smd: 26(-6.082,-7.719) 27(-5.582,-7.719) 28(-5.082,-7.719) 29(-4.582,-7.719) 30(-4.082,-7.719) 31(-3.582,-7.719) 32(-3.082,-7.719) 33(-2.582,-7.719) 34(-2.082,-7.719) 35(-1.582,-7.719) 36(-1.082,-7.719) 37(-0.582,-7.719) 38(-0.082,-7.719) 39(0.418,-7.719) 40(0.918,-7.719) 41(1.418,-7.719) 42(1.918,-7.719) 43(2.418,-7.719) 44(2.918,-7.719) 45(3.418,-7.719) 46(3.918,-7.719) 47(4.418,-7.719) 48(4.918,-7.719) 49(5.418,-7.719) 50(5.918,-7.719) 76(5.918,7.731) 77(5.418,7.731) 78(4.918,7.731) 79(4.418,7.731) 80(3.918,7.731) 81(3.418,7.731) 82(2.918,7.731) 83(2.418,7.731) 84(1.918,7.731) 85(1.418,7.731) 86(0.918,7.731) 87(0.418,7.731) 88(-0.082,7.731) 89(-0.582,7.731) 90(-1.082,7.731) 91(-1.582,7.731) 92(-2.082,7.731) 93(-2.582,7.731) 94(-3.082,7.731) 95(-3.582,7.731) 96(-4.082,7.731) 97(-4.582,7.731) 98(-5.082,7.731) 99(-5.582,7.731) 100(-6.082,7.731)
  silkscreen extent -8.09,-5.8 5.65,7.87, body extent -8.18,-8.1 8.02,8.1, height 2
Mark1 [mm] "基准点 无边框"
  round 1 all layers, no hole: 0(0,0)
MOS-SOT23 [mm] "焊盘加长型"
  rect 0.762x1.27 smd: D(0,1.2) G(-0.95,-1.2) S(0.95,-1.2)
  silkscreen extent -1.27,-0.15 1.27,0.58, body extent -1.45,-1.5 1.45,1.3, height 1.2
"NY PMS 440 0025 PH"#1 [mm] "4-40 nylon screw and mounting hole"
  round 8 hole 3.2: 1(0,0)
  body extent -3.3,-3.3 3.3,3.3, height 2.69
"NY PMS 440 0025 PH"#2 [mm] "4-40 nylon screw and mounting hole"
  round 8 hole 3.2: 1(-0.105,0.098)
  body extent -3.3,-3.3 3.3,3.3, height 2.69
R0603 [mm]
  rect 0.8x1 smd mask+0.051: 1(-0.8,0) 2(0.8,0)
  silkscreen extent -0.15,-0.4 0.15,0.4, body extent -0.79,-0.4 0.81,0.4, height 0.43
RK09K1130 [mm] "立式可调电位器"
  oval 2.5x3.5 hole 1.5 slot 2.5 at 90 deg: 0(-4.4,0) 0(4.4,0)
  oval 1.8x2 hole 1.1: 1(-2.5,-7) 2(0,-7) 3(2.5,-7)
  silkscreen extent -4.9,-5.88 4.9,5.5, body extent -5.7,-7.15 5.7,5.5, height 19.5
SIP2C [mil] "带短路帽"
  round 66 hole 40 paste-4: 1(-50,0) 2(50,0)
  silkscreen extent -100,-50 100,50, body extent -100,-52 100,50, height 344
SMA [mm] "DO-214AC"
  rect 2.3x1.75 smd: 1(1.9,0) 2(-1.9,0)
  silkscreen extent -2.2,-1.5 2.2,1.5, body extent -2.3,-1.37 2.3,1.33, height 2.4
SMB2 [mm] "双向TVS"
  rect 1.52x2.3 smd: 1(-2.14,0) 2(2.14,0)
  silkscreen extent -2.7,-1.8 2.7,1.8, body extent -2.7,-1.8 2.7,1.8, height 2.3
SMD_LED0805_LED [mm]
  rect 1.16x1.47 smd: 1(0.875,0) 2(-0.875,0)
  silkscreen extent -2.3,-1.04 1.75,1.04, body extent -1.01,-0.62 1.01,0.62, height 1.1
SO-8 [mil]
  rect 20x60 smd: 1(-75,-112.5) 2(-25,-112.5) 3(25,-112.5) 4(75,-112.5) 5(75,112.5) 6(25,112.5) 7(-25,112.5) 8(-75,112.5)
  silkscreen extent -94,-52 93,49, body extent -96,-111 96,125, height 64
SOIC-16_150mil [mm]
  oval 0.6x1.8 smd: 1(-4.445,-2.6) 2(-3.175,-2.6) 3(-1.905,-2.6) 4(-0.635,-2.6) 5(0.635,-2.6) 6(1.905,-2.6) 7(3.175,-2.6) 8(4.445,-2.6) 9(4.445,2.6) 10(3.175,2.6) 11(1.905,2.6) 12(0.635,2.6) 13(-0.635,2.6) 14(-1.905,2.6) 15(-3.175,2.6) 16(-4.445,2.6)
  silkscreen extent -5.51,-2.66 4.9,1.4, body extent -5,-2.8 4.98,3.11, height 1.45
SOT-23 [mm]
  rect 1.25x0.7 smd: 1(1.25,-0.95) 2(1.25,0.95) 3(-1.25,0)
  silkscreen extent -0.65,-1.46 0.9,1.46, body extent -1.5,-1.5 1.5,1.5, height 1.3
SOT-223 [mm] "SOT-223/SC-73; 4 Leads; Body 6.7 x 7.3 mm, inc. leads (LxW max)"
  rect 1.05x2.15 smd: 1(-2.3,-3.1) 2(0,-3.1) 3(2.3,-3.1)
  rect 3.4x2.15 smd: 2(0,3.1)
  silkscreen extent -3.35,-1.63 3.35,1.63, body extent -3.3,-3.5 3.4,3.71, height 1.85
SPARK_GAP [mil] "无Paste层"
  rect 10x20 smd paste-39.37: 1(0,20) 2(0,-10)
  Top Layer region: -15,30 -25,30 -25,-30 25,-30 25,30 15,30 15,-20 -15,-20
SUN-0905-3V [mm] "蜂鸣器/9.6*5 有源 3V 电磁蜂鸣器"
  round 2 hole 1 slot 1.25 at 0 deg: 1(-2.5,0) 2(2.5,0)
  silkscreen extent -5,-5 5,5, body extent -4.99,-5 5,5, height 6.05
SW2 [mm] "扭子开关单刀无复位无中点"
  round 2 hole 1.2: 0(-5.1,-2.54) 0(-5.1,2.54) 1(0,-2.54) 2(0,0) 3(0,2.54)
  silkscreen extent -9,-4.15 1.5,4.15, body extent -26.1,-4.11 0.7,4.01, height 5.96
SW-3X6 [mm]
  rect 1.8x1.8 smd mask+0.05: 1(0,4.15) 2(0,-4.15)
  silkscreen extent -1.75,-3 1.75,3, body extent -1.75,-2.95 1.75,2.95, height 4
TEST-0.5/1MM [mm]
  round 1 hole 0.5: 1(0,0)
  silkscreen extent -0.75,-0.75 0.75,0.75
TEST-0.8/1.5MM [mm]
  round 1.5 hole 0.8: 1(0,0)
  silkscreen extent -1,-1 1,1
XTAL_5032 [mm] "5032晶振"
  rect 1.7x2.4 smd: 1(-1.85,0) 2(1.85,0)
  silkscreen extent -2.5,-1.6 2.5,1.6, body extent -2.53,-1.55 2.47,1.65, height 1.3

## Part data
C1 C4 C5 C7 C10 C11 C12 C13 C14 C16 C18 C19 C20 C21 C22 C23 C24 C25 C26 C29 C30 C32 C33 C36 C37 C38 C39 C40 C41 C42 C43 C44 C45 C46 C47 C48 C49: library part Cap, "贴片电容", LatestRevisionDate=17-Jul-2002, LatestRevisionNote="Re-released for DXP Platform.", Published=8-Jun-2000, Publisher="Altium Limited"
C2 C3: library part Cap, "COG贴片电容", LatestRevisionDate=17-Jul-2002, LatestRevisionNote="Re-released for DXP Platform.", Published=8-Jun-2000, Publisher="Altium Limited"
C8 C9 C17: library part CAP2, "钽电容", Tolerance error=10%, Brand Name=三星, cost=￥0.01
CN1 CN2: library part "CON 20X2A", "连接器"
CN3: library part Receptacle_7X2, "连接器"
CN4: library part CON4, "连接器"
CN5: library part "D Connector 9", "DB9插座", PackageDocument=O, DatasheetDocument=1-Sep-1999, Gender=Receptacle, LatestRevisionDate=17-Jul-2002, LatestRevisionNote="Re-released for DXP Platform.", Orientation="Right Angle", PackageReference=788750, Positions=9, Published=15-Jun-2001, Publisher="Altium Limited"
D1: library part "D Schottky", "肖特基二极管", Code_JEDEC=DO-214-AA, LatestRevisionDate=17-Jul-2002, LatestRevisionNote="Re-released for DXP Platform.", Published=8-Jun-2000, Publisher="Altium Limited"
D2: library part TVS, "TVS二极管", LatestRevisionDate=17-Jul-2002, LatestRevisionNote="Re-released for DXP Platform.", Published=8-Jun-2000, Publisher="Altium Limited"
DS2 DS3 DS4 DS5 DS6: library part LED0, "发光二极管", LatestRevisionDate=08-Jul-2005, LatestRevisionNote="Mech Layer 1 removed.", PackageDescription="LED; 2 Leads", PackageReference=LED-0, Published=8-Jun-2000, Publisher="Altium Limited"
DS7: library part "Dpy Amber-4K", "4位0.36英寸红色共阴七段数码管", Pin=12, 焊接类型=直插
F1: library part "Fuse Thermal", "自恢复保险丝", LatestRevisionDate=17-Jul-2002, LatestRevisionNote="Re-released for DXP Platform.", PackageReference=PIN-W2/E2.8, Published=24-Mar-1999, Publisher="Altium Limited"
H1 H3 H5 H7: library part CMP-0003617-1, "安装孔"
H2 H4 H6 H8: library part CMP-0003610-1, "Standoff, Hex, 0.5\"L #4-40 Nylon"
J1: library part DC-005, "DC电源接口，内径2.1mm", LatestRevisionDate=17-Jul-2002, LatestRevisionNote="Re-released for DXP Platform.", Published=24-Mar-1999, Publisher="Altium Limited"
JP1 JP2: library part JP2, "连接器+跳线帽"
K1 K2 K3 K4 K5: library part SW-PB, "鸿源精密轻触开关3X6", LatestRevisionDate=17-Jul-2002, LatestRevisionNote="Re-released for DXP Platform.", Published=24-Mar-1999, Publisher="Altium Limited"
L1 L2 L3: library part FB1, "贴片电感BLM21PG221SN", Code_IEC=1005, Code_JEITA=0402, LatestRevisionDate=29-May-2009, LatestRevisionNote="IPC-7351 Footprint Added.", PackageDescription="Chip Inductor", PackageReference=0402-A, Published=8-Jun-2000, Publisher="Altium Limited"
M1 M2 M3: library part CMP-0077181-1, "MARK点"
Q1: library part 2SK3019, "N-MOSFET 60V300mA低开启电压", LatestRevisionDate=17-Jul-2002, LatestRevisionNote="Re-released for DXP Platform.", Published=8-Jun-2000, Publisher="Altium Limited"
R1 R2 R3 R4 R5 R6 R7 R9 R10 R11 R12 R14 R15 R16 R17 R18 R20 R21 R22 R23 R24 R25 R26 R27 R28 R29 R30: library part Res, "贴片电阻", LatestRevisionDate=17-Jul-2002, LatestRevisionNote="Re-released for DXP Platform.", Published=8-Jun-2000, Publisher="Altium Limited"
R13: library part Res, "贴片电阻", Operating Temperature Range=-55~+125℃, Power Rating=1/10W, Temperature Coefficient="100ppm/ ℃", Tolerance=1%, Voltage Rating=75V, Category=贴片电阻, Composition="Thick Film", MountType="Surface Mount (SMD - SMT)", PackageReference=0603, RoHS=Y, Storage Room  Code=000000, Supplier 2=1
R19: library part "RPot SM", "立式可调电位器", DatasheetDocument=Oct-2003, Published=17-Dec-2003, Publisher="Altium Limited"
RP1: library part "Res Pack3", "贴片排阻", Code_JEDEC=MO-150-AC, LatestRevisionDate=17-Jul-2002, LatestRevisionNote="Re-released for DXP Platform.", Published=24-Mar-1999, Publisher="Altium Limited"
S1: library part SW-SPDT, "红色卧式弯脚小型扭子开关5脚2档", DatasheetDocument=05-Dec-2000, LatestRevisionDate=17-Dec-2003, LatestRevisionNote="Schematic revised, PCB Footprint replaced.", Published=24-Mar-1999, Publisher="Altium Limited"
SW1: library part DS-03RP_C458086, BOM_JLCPCB Part Class="Extended Part", BOM_Manufacturer="Korean Hroparts Elec", BOM_Manufacturer Part=DS-03RP, BOM_Supplier=LCSC, BOM_Supplier Part=C458086, Contributor=LCSC, spicePre=S, spiceSymbolName=DS-03RP_C458086
T1 T2 T3 T4 T5 T6: library part "GND SIDE", "静电GAP"
TP1 TP2 TP3 TP4 TP6 TP7 TP8 TP9 TP10 TP11 TP12: library part TP, "测试点"
U1: library part AVP32F08QP100, "进芯32位DSP"
U2: library part AT24C02C, "EEPROM存储器"
U3 U4: library part ASM1117-3.3V, "线性稳压器"
U5: library part BEEP, "超音V有源蜂鸣器 电磁式 脚距5,外径9.5mm"
U6: library part AZ431AN-ATRE1, "2.5V基准芯片 0.5%, 1R,2C,3A", spiceSymbolName=https://item.szlcsc.com/192500.html
U7: library part AIP650E, "无锡中微LED驱动芯片"
U8: "3.3V CANͨѶ"
U9: library part SP3485E, "3.3V 485总线收发器"
U10: library part MAX232, "低压232通讯芯片"
X1: library part XTAL, "5032贴片无源晶振 30MHZ", LatestRevisionDate=17-Jul-2002, LatestRevisionNote="Re-released for DXP Platform.", Published=8-Jun-2000, Supply=https://item.szlcsc.com/113796.html

## Free pads (board coordinates)
  round 1.5 hole 0.8: 2(61.087,43.713) 2(63.398,16.688)

## Via types
v1: diameter 0.6, hole 0.3, Top Layer to Bottom Layer, tented both sides, 235 vias

## Nets (pads, with @x,y where several pads share a name; then routed paths per layer and width w, separated by ;. In a path a pad name is that pad's centre, name@x,y a point inside that pad or via, vN(x,y) a via of type N, cw(c..) or ccw(c..) an arc to the next point about the centre after c; other vN are vias at no path point)
2.5VREF: C37.1 C38.1 JP1.1 R13.2 U6.1 U6.2
485-A: CN4.3 R24.1 T3.1 U9.6 | length 12.6
  Top Layer w0.508: U9.6@91.313,61.201 91.313,63.709 R24.1@92.196,64.592 92.196,69.372 CN4.3@93.207,70.383
  Bottom Layer w0.203: CN4.3@93.207,70.383 93.337,70.254 T3.1@93.337,67.767
485-B: CN4.4 R24.2 T4.1 U9.7 | length 12.6
  Top Layer w0.508: CN4.4@88.207,70.383 89.296,69.294 R24.2@89.296,64.592 90.043,63.845 U9.7@90.043,61.201
  Bottom Layer w0.254: CN4.4@88.207,70.383 88.392,70.199 T4.1@88.392,67.767
A: DS7.a U7.8 | length 16.2
  Top Layer w0.254: v1(32.156,20.904) 32.207,20.955 U7.8@32.207,22.403
  Bottom Layer w0.254: DS7.a@23.114,12.878 23.114,16.815 27.203,20.904 v1(32.156,20.904)
ADCINA0: CN2.32 U1.23 | length 25.8
  Top Layer w0.203: U1.23@74.412,27.524 74.412,16.444 79.692,11.163 81.572,11.163 83.617,9.119 CN2.32@83.617,6.662
ADCINA1: CN2.31 U1.22 | length 28.6
  Top Layer w0.203: U1.22@73.912,27.524 73.912,16.236 79.392,10.757 81.115,10.757 82.347,9.525 82.347,5.029 83.254,4.122 CN2.31@83.617,4.122
ADCINA2: CN2.30 JP2.2 U1.21 | length 47.5
  Top Layer w0.203: U1.21@73.412,27.524 73.412,16.029 79.091,10.351 80.505,10.351 81.305,9.55 81.305,6.891 CN2.30@81.077,6.662 ; v1(82.55,24.409) 82.55,25.476 83.388,26.314 JP2.2@84.912,26.314
  Bottom Layer w0.203: CN2.30@81.077,6.662 81.077,23.52 81.966,24.409 v1(82.55,24.409)
ADCINA3: CN2.29 U1.20 | length 26.8
  Top Layer w0.203: U1.20@72.912,27.524 72.912,15.822 79.781,8.953 79.781,5.418 CN2.29@81.077,4.122
ADCINA4: CN2.28 U1.19 | length 23.4
  Top Layer w0.203: U1.19@72.412,27.524 72.412,15.615 78.537,9.491 CN2.28@78.537,6.662
ADCINA5: CN2.27 U1.18 | length 26.3
  Top Layer w0.203: U1.18@71.912,27.524 71.912,15.408 77.267,10.053 77.267,5.105 78.25,4.122 CN2.27@78.537,4.122
ADCINA6: CN2.26 U1.17 | length 22.8
  Top Layer w0.203: U1.17@71.412,27.524 71.412,15.201 76.073,10.541 76.073,6.738 CN2.26@75.997,6.662
ADCINA7: CN2.25 U1.16 | length 25.5
  Top Layer w0.203: U1.16@70.912,27.524 70.912,14.994 74.752,11.154 74.752,5.367 CN2.25@75.997,4.122
ADCINB0: CN2.33 U1.27 | length 30.1
  Top Layer w0.203: U1.27@77.137,29.749 78.378,29.749 79.019,29.108 79.019,15.062 84.938,9.144 84.938,5.342 CN2.33@86.157,4.122
ADCINB1: CN2.34 U1.28 | length 28.1
  Top Layer w0.203: U1.28@77.137,30.249 78.453,30.249 79.426,29.277 79.426,15.231 86.157,8.5 CN2.34@86.157,6.662
ADCINB2: CN2.35 U1.29 | length 32.2
  Top Layer w0.203: U1.29@77.137,30.749 78.528,30.749 79.832,29.445 79.832,15.494 87.489,7.837 87.489,5.33 CN2.35@88.697,4.122
ADCINB3: CN2.36 U1.30 | length 30.8
  Top Layer w0.203: U1.30@77.137,31.249 78.603,31.249 80.239,29.613 80.239,15.662 87.163,8.738 88.036,8.738 88.773,8.001 88.773,6.739 CN2.36@88.697,6.662
ADCINB4: CN2.37 U1.31 | length 35.4
  Top Layer w0.203: U1.31@77.137,31.749 78.842,31.749 80.645,29.947 80.645,15.831 87.23,9.246 88.798,9.246 90.018,8.026 90.018,5.283 91.178,4.122 CN2.37@91.237,4.122
ADCINB5: CN2.38 U1.32 | length 33.7
  Top Layer w0.203: U1.32@77.137,32.249 78.926,32.249 81.051,30.124 81.051,16.078 87.478,9.652 89.535,9.652 91.237,7.95 CN2.38@91.237,6.662
ADCINB6: CN2.39 U1.33 | length 38.2
  Top Layer w0.203: U1.33@77.137,32.749 79.001,32.749 81.458,30.293 81.458,16.307 87.706,10.058 90.348,10.058 92.558,7.849 92.558,5.342 CN2.39@93.777,4.122
ADCINB7: CN2.40 JP1.2 U1.34 | length 39.5
  Top Layer w0.203: U1.34@77.137,33.249 79.076,33.249 81.864,30.461 81.864,26.187 81.864,23.647 ; JP1.2@84.912,23.622 81.89,23.622 81.864,23.647 ; CN2.40@93.777,6.662 93.777,7.849 91.161,10.465 87.986,10.465 81.864,16.586 81.864,23.647
ADCREFM: C24.1 TP7.1 U1.36 | length 8.2
  Top Layer w0.203: U1.36@77.137,34.249 80.838,34.249 81.636,33.452 TP7.1@83.007,33.452 83.109,33.553 C24.1@84.949,33.553
ADCREFP: C25.1 TP8.1 U1.37 | length 8.1
  Top Layer w0.203: U1.37@77.137,34.749 81.13,34.749 81.686,35.306 TP8.1@83.007,35.306 84.898,35.306 C25.1@84.949,35.357
AGND: C24.2 C25.2 C26.2 C29.2 C32.2 C36.2 C37.2 C38.2 C40.2 CN2.23 CN2.24 L3.2 R10.1 R11.1 R19.1 TP10.1 U1.13 U1.14 U1.24 U1.25 U1.39 U6.3 | length 4.6
  Top Layer w0.203: v1(75.54,35.585) 75.704,35.749 U1.39@77.137,35.749 ; v1(77.851,19.228) C26.2@77.851,20.204
  Top Layer w0.8: R11.1@86.665,37.135 86.665,35.673 C25.2@86.981,35.357
  other v1: 84.963,16.561 84.963,17.196 69.418,17.247 69.621,18.237 69.24,19.304 83.82,20.853 83.82,21.641 76.352,27.356 69.952,29.007 69.291,29.032 75.362,29.134 87.935,33.503 87.935,35.331
AVDD1V8: C29.1 L2.2 U1.12 U1.40 | length 33.1
  Top Layer w0.203: U1.12@68.912,27.524 68.912,26.16 v1(70.002,25.07) ; v1(73.609,33.071) 73.609,35.077 74.781,36.249 U1.40@77.137,36.249
  Top Layer w0.381: L2.2@66.853,14.656 67.144,14.946 C29.1@68.707,14.946 69.785,14.946 70.417,15.578 70.417,24.655 v1(70.002,25.07)
  Bottom Layer w0.203: v1(70.002,25.07) 69.545,25.527 69.545,27.203 70.942,28.6 70.942,31.547 72.466,33.071 v1(73.609,33.071)
AVDD3V3: C26.1 C32.1 C36.1 CN2.21 CN2.22 L1.2 R13.1 R19.3 TP9.1 U1.15 U1.26 U1.96 | length 27.8
  Top Layer w0.203: U1.96@61.687,31.249 64.117,31.249 v1(64.16,31.293) ; v1(70.256,26.035) 70.412,26.191 U1.15@70.412,27.524
  Top Layer w0.254: v1(76.81,21.565) 76.849,21.604 C26.1@77.851,21.604 77.851,22.911 78.588,23.647 78.588,28.93 78.268,29.249 U1.26@77.137,29.249
  Top Layer w0.8: C36.1@86.781,15.494 88.494,15.494 v1(88.519,15.519) 88.519,17.436 R13.1@88.494,17.461
  Bottom Layer w0.203: v1(64.16,31.293) 64.16,31.09 65.049,30.201 v1(69.088,30.201) ; v1(69.088,22.657) 70.714,24.282 70.714,25.578 v1(70.256,26.035)
  other v1: 88.519,16.154 68.326,22.631 68.707,23.292
B: DS7.b U7.9 | length 4.8
  Top Layer w0.254: U7.9@32.207,17.203 32.207,15.367 33.274,14.3 DS7.b@33.274,12.878
C: DS7.c U7.11 | length 18.9
  Top Layer w0.254: v1(28.194,6.858) 31.115,6.858 34.747,10.49 U7.11@34.747,17.203
  Bottom Layer w0.254: DS7.c@28.194,2.718 v1(28.194,6.858)
CAN_H: CN4.2 R22.2 T2.1 U8.7 | length 12.7
  Top Layer w0.508: CN4.2@98.207,70.383 99.304,69.287 R22.2@99.304,64.592 100.254,63.642 U8.7@100.254,61.201
  Bottom Layer w0.254: CN4.2@98.207,70.383 98.281,70.31 T2.1@98.281,67.767
CAN_L: CN4.1 R22.1 T1.1 U8.6 | length 12.5
  Top Layer w0.508: U8.6@101.524,61.201 101.524,63.912 R22.1@102.204,64.592 102.204,69.38 CN4.1@103.207,70.383
  Bottom Layer w0.254: CN4.1@103.207,70.383 103.226,70.365 T1.1@103.226,67.767
D: DS7.d U7.12 | length 24.3
  Top Layer w0.254: v1(24.562,5.994) 32.156,5.994 36.017,9.855 U7.12@36.017,17.203
  Bottom Layer w0.254: DS7.d@23.114,2.718 23.114,4.547 v1(24.562,5.994)
D1: DS7.com1 U7.1 | length 34
  Top Layer w0.254: v1(41.046,20.879) 41.097,20.93 U7.1@41.097,22.403
  Bottom Layer w0.254: DS7.com1@20.574,12.878 20.574,11.836 22.225,10.185 40.183,10.185 41.092,11.095 41.092,20.833 v1(41.046,20.879)
D2: DS7.com2 U7.5 | length 14.2
  Top Layer w0.254: U7.5@36.017,22.403 36.043,22.377 v1(36.043,21.057)
  Bottom Layer w0.254: DS7.com2@28.194,12.878 28.194,15.646 33.604,21.057 v1(36.043,21.057)
D3: DS7.com3 U7.6 | length 11.3
  Top Layer w0.254: U7.6@34.747,22.403 34.747,20.549 v1(34.849,20.447)
  Bottom Layer w0.254: DS7.com3@30.734,12.878 30.734,16.332 v1(34.849,20.447)
D4: DS7.com4 U7.7 | length 30.4
  Top Layer w0.254: DS7.com4@33.274,2.718 35.535,2.718 40.284,7.468 v1(40.284,12.548) ; U7.7@33.477,22.403 33.477,20.65 34.234,19.893 40.111,19.893 v1(40.208,19.99)
  Bottom Layer w0.254: v1(40.208,19.99) 40.208,12.624 v1(40.284,12.548)